# Altium PCB MD52-BC911MCU-影石电池版-261010.PcbDoc
Units mm, origin at the board's own origin, x right, y up, seen from the top; angles counter-clockwise.
Board outline 82 x 22 mm, 4 copper layers (Top Layer, Mid-Layer1, Mid-Layer2, Bottom Layer), stack 0.778 mm thick; 61 components, 61 nets, 197 pads, 154 vias.
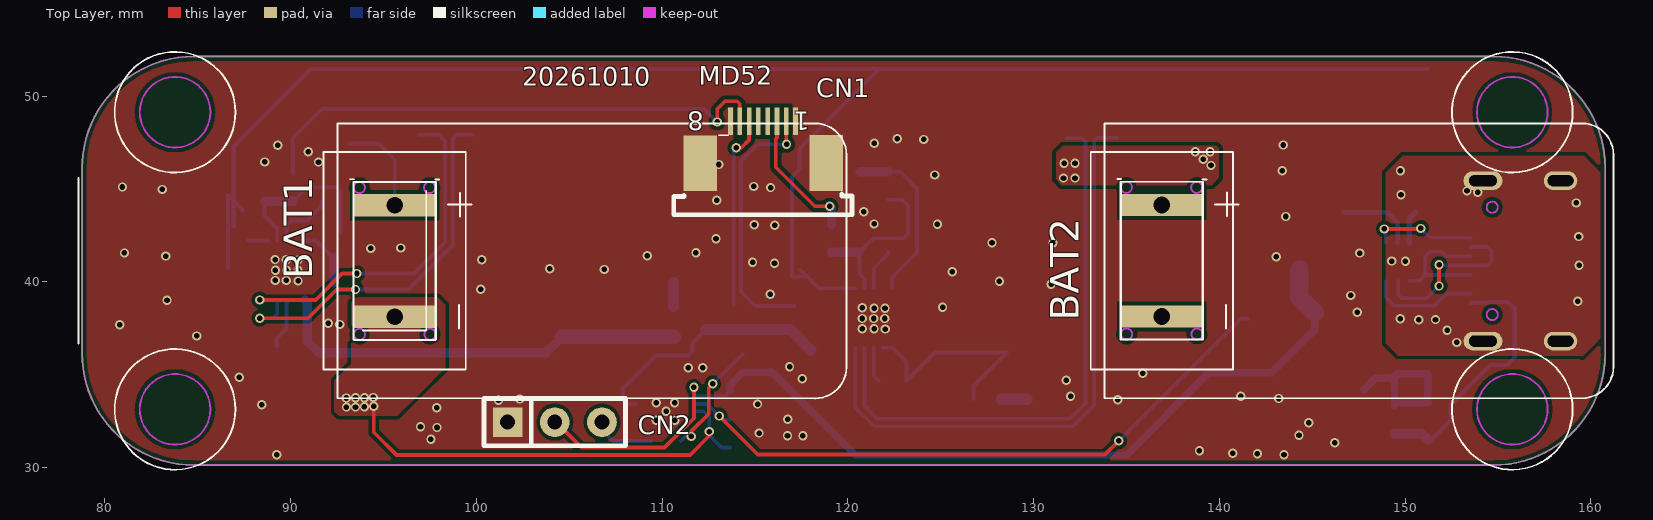
[diagram p0: Top Layer view]
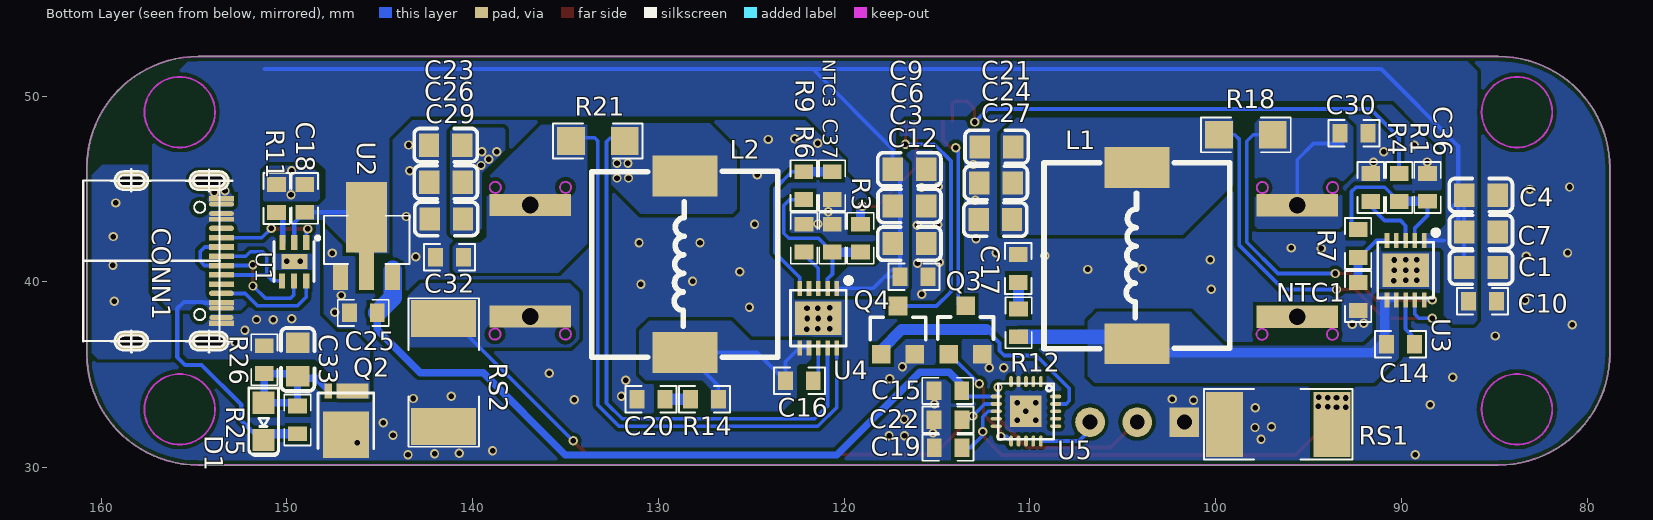
[diagram p1: Bottom Layer view, seen from below]

## Layer stack, top to bottom
Top Solder: solder mask 0.0102, Solder Resist, Dk 3.5
Top Layer: signal copper 0.0356
Dielectric 1: core 0.254, FR-4, Dk 4.2
Mid-Layer1: signal copper 0.036
Dielectric 3: prepreg 0.127, Dk 4.2
Mid-Layer2: signal copper 0.036
Dielectric 2: core 0.254, Dk 4.2
Bottom Layer: signal copper 0.0356
Bottom Solder: solder mask 0.0102, Solder Resist, Dk 3.5

## Board outline
78.774,36.137 ccw(c84.774,36.137) 84.774,30.137 154.774,30.137 ccw(c154.774,36.137) 160.774,36.137 160.774,46.137 ccw(c154.774,46.137) 154.774,52.137 84.774,52.137 ccw(c84.774,46.137) 78.774,46.137

## Design rules (kind name [scope] priority, off if disabled: settings)
Clearance [All] p1: gap=0.2 ignorepadtopadclearanceinfootprint=FALSE
ComponentClearance [All] p1: gap=0 collisioncheckmode=3 verticalgap=0 showdistances=FALSE
PlaneConnect [All] p1: planeconnectstyle=Direct reliefexpansion=0.508 reliefentries=4 reliefconductorwidth=0.254 reliefairgap=0.254
PolygonConnect [All] p1: connectstyle=Direct reliefconductorwidth=0.254 reliefentries=4 polygonreliefangle="90 Angle" airgapwidth=0.254
RoutingVias [All] p1: holewidth=0.711 width=1.27 viastyle="Through Hole" minholewidth=0.3 minwidth=0.5 maxholewidth=0.711 maxwidth=1.27
SilkToSolderMaskClearance [IsPad] p1: minsilkscreentomaskgap=0.1 clearancetoexposedcopper=TRUE
SolderMaskExpansion [All] p1: expansion=0.102 istentingtop=FALSE
Width [All] p1: maxlimit=10 minlimit=0.1 preferedwidth=0.15
27 further rules are at their usual default settings.

## Classes and differential pairs
component class HUSB337+SW6201+SW6201+SW6201+PY32F031(1)(3): C1 C3 C4 C6 C7 C9 C10 C12 C14 C16 C17 C18 C20 C21 C24 C26 C27 C29 C30 C32 CONN1 L1 L2 NTC1 NTC3 R1 R3 R4 R6 R7 R9 R11 R14 R18 R21 U3

## Components (designator, comment, footprint, x,y, rotation, side; value= is the part's Value field where it differs from the comment)
BAT1 "Comment" "电池座 -2-4PIN-2.0MM" 95.6,41.13 r90 top locked
BAT2 "Comment" "电池座 -2-4PIN-2.0MM" 136.9,41.14 r90 top locked
C1 "10uF/16V X7R 10%" "SMD-C0805 锡膏" 84.81,40.77 r0 bottom locked
C3 "10uF/16V X7R 10%" "SMD-C0805 锡膏" 115.59,42.06 r0 bottom locked (schematic designator C9)
C4 "NC" "SMD-C0805 锡膏" 84.82,44.67 r0 bottom locked
C6 "NC" "SMD-C0805 锡膏" 115.58,44.09 r0 bottom locked
C7 "NC" "SMD-C0805 锡膏" 84.81,42.69 r0 bottom locked
C9 "NC" "SMD-C0805 锡膏" 115.59,46.06 r0 bottom locked (schematic designator C3)
C10 "0.1uF" 0603 85.63,38.96 r0 bottom locked
C12 "0.1uF" 0603 116.24,40.28 r0 bottom locked
C14 "0.1uF" 0603 90.04,36.64 r180 bottom locked
C15 "2.2uf/50v" 0603 114.42,34.13 r0 bottom locked (schematic designator C3)
C16 "0.1uF" 0603 122.41,34.67 r180 bottom locked
C17 "1nF" 0603 110.62,40.72 r270 bottom locked
C18 "1uF/50V X7R 10%" 0603 149.04,44.5 r90 bottom locked
C19 "0.1uf/50v" 0603 114.4,31.08 r180 bottom locked (schematic designator C3)
C20 "1nF" 0603 130.4,33.68 r180 bottom locked
C21 "22uF/16V X7R 10%" "SMD-C0805 锡膏" 112.69,47.27 r180 bottom locked
C22 "0.1uf/50v" 0603 114.41,32.58 r180 bottom locked (schematic designator C3)
C23 "22uF/16V X7R 10%" "SMD-C0805 锡膏" 142.35,47.36 r180 bottom locked
C24 "22uF/16V X7R 10%" "SMD-C0805 锡膏" 112.73,45.33 r180 bottom locked (schematic designator C27)
C25 "0.1uf/50v" 0603 145.89,38.33 r180 bottom locked (schematic designator C3)
C26 "22uF/16V X7R 10%" "SMD-C0805 锡膏" 142.34,45.36 r180 bottom locked
C27 "NC" "SMD-C0805 锡膏" 112.76,43.36 r180 bottom locked (schematic designator C24)
C29 "NC" "SMD-C0805 锡膏" 142.32,43.39 r180 bottom locked
C30 "1uF" 0603 92.55,48.01 r0 bottom locked
C32 "1uF" 0603 141.25,41.32 r180 bottom locked
C33 "10uF/16V X7R 10%" "SMD-C0805 锡膏" 149.42,34.92 r90 bottom locked (schematic designator C21)
C36 "10nF/50V" 0603 88.59,45.09 r270 bottom locked (schematic designator C14)
C37 "10nF/50V" 0603 120.63,42.35 r270 bottom locked (schematic designator C14)
CN1 "" 连接器0.5*8 115.45,47.52 r180 top locked
CN2 "" SIP3 101.68,32.45 r0 top locked
CONN1 "输入" "SMD-TYPEC_16Pin 卧式" 152.94,36.81 r0 bottom locked
D1 "1N4148" SOD-323 151.26,32.49 r90 bottom locked
L1 "4.7uH" "SMD-L WHC1040 锡膏" 104.24,36.67 r90 bottom locked
L2 "4.7uH" "SMD-L WHC1040 锡膏" 128.58,36.2 r90 bottom locked (schematic designator L3)
NTC1 "NC" 0603 92.33,39.21 r270 bottom locked (schematic designator NTC)
NTC3 "NC" 0603 120.65,45.18 r270 bottom locked (schematic designator NTC2)
Q2 "SLN30N03T" DFN33-1 147.12,32.95 r0 bottom locked (schematic designator Q1)
Q3 "2N7002" SOT323 113.46,37.51 r90 bottom
Q4 "2N7002" SOT323 117.1,37.5 r90 bottom locked
R1 "10K" 0603 90.12,45.08 r90 bottom locked
R3 "10K" 0603 119.12,42.35 r90 bottom locked
R4 "910k" 0603 91.64,45.08 r90 bottom locked
R6 "910k" 0603 122.16,42.35 r90 bottom locked
R7 "NC" 0603 92.33,42.07 r90 bottom locked
R9 "NC" 0603 122.18,45.18 r270 bottom locked
R11 "NC" 0603 150.56,44.49 r90 bottom locked
R12 "4.7R" 0603 110.61,37.8 r90 bottom locked
R14 "4.7R" 0603 127.52,33.68 r0 bottom locked
R18 "22mR" 1206 98.37,47.92 r0 bottom locked
R21 "22mR" 1206 133.26,47.59 r180 bottom locked
R25 "20K" 0603 149.43,32.57 r90 bottom locked (schematic designator R4)
R26 "200K" 0603 151.21,35.81 r90 bottom locked (schematic designator R4)
RS1 "0.05R" 2512 96.63,32.33 r0 bottom locked (schematic designator R4)
RS2 "0.05R" 2512 141.56,35.12 r270 bottom locked (schematic designator R4)
U1 "HUSB237" HUSB237 149.27,41.3 r270 bottom locked
U2 "ME6203A33PG" SOT-89 145.71,42.26 r90 bottom locked
U3 "BC911 DNF" "DFN33 - 10PIN" 89.77,40.63 r0 bottom locked (schematic designator U1)
U4 "BC911 DNF" "DFN33 - 10PIN" 121.39,38.05 r0 bottom locked
U5 "WY8S8002A" QFN3*3-20 110.21,33.03 r270 bottom locked

## Footprints (in the part's own frame and the unit in brackets; to place one, negate y for a bottom-side part, rotate by r counter-clockwise, add the part's x,y. Pads: shape width x height; smd on the part's side, far side on the other; paste and mask are expansions set on the pad)
0603 [mm]
  rect 0.8x1 smd: 1(0.75,0) 2(-0.75,0)
  silkscreen extent -1.37,-0.71 1.37,0.71
1206 [mm]
  rect 1.5x1.5 smd: 1(1.448,0) 2(-1.448,0)
  silkscreen extent -2.41,-0.94 2.41,0.94
2512 [mm]
  rect 2x3.5 smd: 1(2.9,0) 2(-2.9,0)
  silkscreen extent -4,-1.9 4,1.9
"DFN33 - 10PIN" [mm]
  rect 0.25x0.8 smd: 1(-1,-1.6) 2(-0.5,-1.6) 3(0,-1.6) 4(0.5,-1.6) 5(1,-1.6) 6(1,1.6) 7(0.5,1.6) 8(0,1.6) 9(-0.5,1.6) 10(-1,1.6)
  rect 2.5x1.8 smd: 11(0,0)
  silkscreen extent -1.66,-2.06 1.5,1.5
DFN33-1 [mm]
  rect 0.4x0.8 smd: 1(0.65,-1.175)
  rect 2.5x2.5 smd: 2(-0.3,1.175)
  rect 1.7x0.8 smd: 3(-0.65,-1.175)
  silkscreen extent -1.8,-1.07 1.2,1.93
HUSB237 [mil]
  rect 31.5x13.23 smd: "1 CC1"(-32,12) "2 VBUS"(-32,-13) "3 VSET"(-32,-38) "4 D+"(49,-39) "5 D-"(49,-14) "6 "(49,12)
  rect 31.5x55.12 smd: EP(8,-13)
  silkscreen extent -45,-56 50,40
QFN3*3-20 [mm]
  oval 0.6x0.2 smd: 1(-1.6,0.8) 2(-1.6,0.4) 3(-1.6,0) 4(-1.6,-0.4) 5(-1.6,-0.8) 11(1.6,-0.8) 12(1.6,-0.4) 13(1.6,0) 14(1.6,0.4) 15(1.6,0.8)
  oval 0.2x0.6 smd: 6(-0.8,-1.6) 7(-0.4,-1.6) 8(0,-1.6) 9(0.4,-1.6) 10(0.8,-1.6) 16(0.8,1.6) 17(0.4,1.6) 18(0,1.6) 19(-0.4,1.6) 20(-0.8,1.6)
  rect 1.7x1.7 smd: 21(0,0)
  silkscreen extent -1.5,-1.5 1.5,1.5
SIP3 [mm]
  rect 1.6x1.6 hole 0.8: 1(0,0)
  round 1.6 hole 0.8: 2(2.54,0)
  round 1.6 hole 0.813: 3(5.08,0)
  silkscreen extent -1.27,-1.27 6.35,1.27
"SMD-C0805 锡膏" [mm]
  rect 1.1x1.25 smd: 1(0,0) 2(1.8,0)
  silkscreen extent -0.8,-0.9 2.6,0.9, body extent -0.1,-0.64 1.9,0.61, height 1.25
"SMD-L WHC1040 锡膏" [mm]
  rect 2.2x3.5 smd: 1(0,0) 2(9.492,0)
  silkscreen extent -0.26,-5 9.75,5, body extent -0.45,-5 9.95,5, height 3.9
"SMD-TYPEC_16Pin 卧式" [mm]
  oval 2.1x1 hole 0.6 slot 1.5 at 0 deg: 0(1.253,-8.64) 0(1.253,0)
  oval 1.8x1 hole 0.6 slot 1.4 at 0 deg: 0(5.433,-8.64) 0(5.433,0)
  round 0.3 on Bottom Overlay: 0(8.033,-4.32)
  rect 1.34x0.3 smd: A1(0.583,-7.67) A5(0.583,-5.57) A6(0.583,-4.57) A7(0.583,-4.07) A8(0.583,-3.07) A12(0.583,-0.97) B4(0.583,-2.07) B6(0.583,-3.57) B7(0.583,-5.07)
  oval 1.34x0.25 smd: A4(0.583,-6.87) A9(0.583,-1.77) B12(0.583,-7.37)
  oval 1.3x0.25 smd: B1(0.583,-1.27)
  oval 1.34x0.3 smd: B5(0.583,-2.57) B8(0.583,-6.07)
  rect 1.34x0.25 smd: B9(0.583,-6.57)
  Keep-Out Layer circle w0.1: c1.753,-1.43 r0.3
  Keep-Out Layer circle w0.1: c1.753,-7.21 r0.3
  silkscreen extent -0.03,-9.25 8.03,0.64
SOD-323 [mm]
  rect 1.2x1.2 smd: 1(1,0) 2(-1,0)
  silkscreen extent -1.85,-0.8 1.8,0.8
SOT323 [mm]
  rect 1x1 smd: 1(-1.4,0.9) 2(1.2,0) 3(-1.4,-0.9)
  silkscreen extent -0.6,-1.5 0.6,1.5
SOT-89 [mm]
  rect 1.4x0.8 smd: 1(-2,1.4) 3(-2,-1.4)
  rect 5x0.8 smd: 2(-0.2,0)
  rect 3.8x2.2 smd: 2(1.225,0)
  silkscreen extent -1.3,-2.3 1.3,2.3
"电池座 -2-4PIN-2.0MM" [mm]
  rect 1.2x4.4 hole 0.9: 1(-3,0) 4(3,0)
  Keep-Out Layer circle w0.1: c-3.95,-1.898 r0.3
  Keep-Out Layer circle w0.1: c3.95,1.902 r0.3
  Keep-Out Layer circle w0.1: c-3.951,1.892 r0.3
  Keep-Out Layer circle w0.1: c3.949,-1.883 r0.3
  silkscreen extent -4.25,-4.14 4.4,2.4
连接器0.5*8 [mm]
  rect 0.25x1.5 smd paste+0 mask+0.051: 1(-1.732,-1.132) 2(-1.232,-1.132) 3(-0.732,-1.132) 4(-0.232,-1.132) 5(0.268,-1.132) 6(0.768,-1.132) 7(1.268,-1.132) 8(1.768,-1.132)
  rect 1.8x3 smd paste+0 mask+0.051: 9(3.388,1.132) 10(-3.388,1.122)
  silkscreen extent -4.78,-0.38 4.83,3.9

## Part data
C1 C3 C4 C6 C7 C9 C10 C12 C14 C15 C16 C17 C19 C20 C21 C22 C23 C24 C25 C26 C27 C29 C30 C32 C33 C36 C37: library part CAP0603, "Capacitor"
C18: library part Cap, "Capacitor"
CONN1: library part "TYPC C"
L1 L2: library part INDUCTOR_SPM1010, "INDUCTOR"
NTC1 NTC3: library part "Res Varistor", "Varistor (Voltage-Sensitive Resistor)"
Q2: library part MOSFET-EH-P
R1 R3 R4 R6 R7 R9 R11 R12 R14 R18 R21 R25 R26 RS1 RS2: library part RES_0603, "Resistor"

## Via types
v1: diameter 0.5, hole 0.3, Top Layer to Bottom Layer, 154 vias

## Nets (pads, with @x,y where several pads share a name; then routed paths per layer and width w, separated by ;. In a path a pad name is that pad's centre, name@x,y a point inside that pad or via, vN(x,y) a via of type N, cw(c..) or ccw(c..) an arc to the next point about the centre after c; other vN are vias at no path point)
3.3V: C15.2 C25.1 CN2.2 U2.3 U5.6 | length 53.1
  Top Layer w0.2: CN2.2@104.23,32.27 104.47,32.27 105.66,31.08 110.134,31.08 111.71,32.656 v1(111.71,34.32)
  Bottom Layer w0.2: v1(111.71,34.32) 111.71,33.98 111.86,33.83 113.37,33.83 C15.2
  Bottom Layer w0.4: C15.2 113.67,34.46 114.35,35.14 115.93,35.14 120.39,30.68 135.02,30.68 139.44,35.1 142.82,35.1 145.14,37.42 C25.1
  Bottom Layer w1: U2.3@144.31,40.64 144.31,39.16 C25.1
12V: 
a1: "U1.3 VSET" R11.2 | length 1.8
  Bottom Layer w0.3: 150.235,42.113 150.235,43.415 R11.2
a2: C33.1 D1.1 Q2.1 R25.1 R26.2 | length 8.9
  Bottom Layer w0.4: Q2.1@147.77,34.185 148.39,34.805 149.305,34.805 C33.1 ; C33.1 149.56,35.06 R26.2 151.21,33.54 D1.1 149.6,33.49 R25.1 149.43,34.91 C33.1
a3: 
a4: 
a5: Q3.1 U5.11 | length 6.3
  Top Layer w0.2: v1(111.56,31.68) 111.56,31.94 112.51,32.89 112.51,34.294 v1(112.73,34.514)
  Bottom Layer w0.2: U5.11 111.26,31.68 v1(111.56,31.68) ; v1(112.73,34.514) 114.326,36.11 Q3.1
a6: Q4.1 U5.19 | length 13.8
  Bottom Layer w0.2: U5.19 108.04,33.43 107.875,33.595 107.875,34.255 109.66,36.04 111.38,36.04 111.63,36.29 111.63,36.717 112.343,37.43 ; Q4.1 Q4.1@118,36.33
  Bottom Layer w0.6: 112.343,37.43 116.9,37.43 Q4.1@118,36.33
a7: CN2.3 U5.15 | length 3.2
  Bottom Layer w0.2: CN2.3@106.545,32.235 107.35,31.43 U5.15
A8: CONN1.A8
a9: 
B8: CONN1.B8
CC1: "U1.6 " CONN1.B5 | length 5.9
  Bottom Layer w0.2: 148.965,40.055 148.965,39.185 149.43,38.72 151.58,38.72 152.24,39.38 CONN1.B5
CC2: "U1.1 CC1" CONN1.A5 | length 5.7
  Top Layer w0.2: v1(148.88,42.85) 150.82,42.85 v1(150.85,42.88)
  Bottom Layer w0.2: v1@148.85,42.88 v1(148.88,42.85) 148.965,42.765 148.965,42.113 ; v1(150.85,42.88) 151.35,42.38 CONN1.A5
DM: "U1.5 D-" CONN1.A7 CONN1.B7 | length 9.1
  Top Layer w0.2: v1(151.83,39.78) v1(151.83,40.92)
  Bottom Layer w0.2: 149.626,40.055 149.626,39.304 149.81,39.12 151.16,39.12 v1@151.81,39.77 ; v1(151.83,40.92) 151.87,40.88 CONN1.A7 154.44,40.88 154.67,41.11 154.67,41.64 154.43,41.88 CONN1.B7
DP: "U1.4 D+" CONN1.A6 CONN1.B6 | length 7.1
  Bottom Layer w0.2: 150.261,40.055 150.77,40.055 151.08,40.365 ; CONN1.B6 153.523,40.37 151.085,40.37 151.08,40.365 ; CONN1.A6 152.22,41.38 151.98,41.62 151.32,41.62 151.08,41.38 151.08,40.365
GND: C1.1 C3.1 C4.1 C6.1 C7.1 C9.1 C10.2 C12.2 C15.1 C17.2 C19.2 C20.2 C21.1 C22.2 C23.1 C24.1 C25.2 C26.1 C27.1 C29.1 C30.2 C32.2 C36.2 C37.2 CN1.1 CN1.8 CN1.9 CN1.10 CN2.1 NTC1.1 NTC3.1 Q2.2 Q3.3 Q4.3 R4.1 R6.1 RS1.1 RS2.1 U2.1 U3.11 U4.11 U5.4 U5.21
  other v1: 89.25,30.69 143.48,30.7 142.05,30.74 140.72,30.78 138.93,30.91 146.21,31.34 97.55,31.52 116.75,31.72 117.58,31.72 144.29,31.74 115.22,31.86 97.88,32.16 96.99,32.2 144.81,32.41 109.69,32.55 110.68,32.54 116.76,32.6 110.21,33.03 97.87,33.22 88.44,33.39 115.14,33.42 109.69,33.49 110.67,33.5 101.19,33.62 134.53,33.65 102.34,33.69 143.2,33.72 131.99,33.85 141.16,33.84 131.76,34.7 117.55,34.79 87.23,34.87 135.88,35.08 111.41,35.38 112.19,35.38 116.86,35.43 84.95,37.09 120.78,37.48 121.41,37.47 122.01,37.46 80.8,37.7 92.65,37.71 92.02,37.78 120.78,38.03 121.4,38.03 121.99,38.03 147.42,38.37 121.41,38.58 122,38.58 120.77,38.61 125.1,38.63 83.34,39.01 147.07,39.27 115.82,39.33 100.23,39.6 130.94,39.87 128.16,40.04 90.4,40.05 89.17,40.08 89.76,40.08 125.62,40.54 89.18,40.63 89.77,40.63 90.39,40.63 106.88,40.67 103.95,40.7 116.05,41.01 114.87,41.05 89.76,41.19 90.39,41.18 100.29,41.19 89.16,41.2 143.06,41.36 83.28,41.39 109.2,41.4 81.05,41.56 111.82,41.57 147.56,41.55 94.31,41.8 95.93,41.83 127.76,42.11 131.04,42.11 112.9,42.32 116.07,43.05 114.96,43.08 121.41,43.12 124.82,43.1 143.57,43.52 120.86,43.77 112.94,44.39 83.09,44.98 115.84,45.08 80.94,45.11 114.93,45.14 124.67,45.76 143.39,45.99 113.05,46.32 88.6,46.46 91.5,46.45 90.94,47.01 89.31,47.36 143.44,47.37 121.42,47.47 124.08,47.67 122.66,47.7
GND1: C18.1 C33.2 CONN1.0@154.193,36.81 CONN1.0@154.193,45.45 CONN1.0@158.373,36.81 CONN1.0@158.373,45.45 CONN1.A1 CONN1.A12 CONN1.B1 CONN1.B12 Q2.3 R11.1 R26.1 U1.EP
  other v1: 152.78,36.74 152.26,37.4 150.74,37.96 151.64,37.97 149.74,38.02 159.29,38.96 159.37,40.89 150.02,41.11 149.29,41.12 159.35,42.44 159.21,44.25 149.78,44.69 153.91,44.82 153.335,44.896 149.75,45.99
LEDG_1: CN1.7 R1.1 | length 28.8
  Top Layer w0.2: v1(112.96,48.61) 112.96,49.3 113.38,49.72 114.05,49.72 114.182,49.588 CN1.7
  Bottom Layer w0.2: R1.1 90.12,47.77 91.66,49.31 112.26,49.31 v1(112.96,48.61)
LEDG_2: CN1.3 R3.1 | length 7.3
  Top Layer w0.2: CN1.3 116.182,47.762 116.12,47.7 116.12,46.17 118.22,44.07 v1(119.02,44.07)
  Bottom Layer w0.5: v1(119.02,44.07) 119.12,43.97 R3.1
LEDG_3: 
LEDR_1: CN1.6 Q3.2 | length 10.4
  Top Layer w0.2: v1(113.99,47.22) 114.26,47.22 114.682,47.642 CN1.6
  Bottom Layer w0.2: Q3.2@113.85,38.73 113.85,47.08 v1(113.99,47.22) v1@114,47.23
LEDR_2: CN1.2 Q4.2 | length 14.3
  Top Layer w0.2: CN1.2 116.682,47.392 v1(116.7,47.41)
  Bottom Layer w0.2: v1(116.7,47.41) 115.15,47.41 114.25,46.51 114.25,39.47 115.02,38.7 Q4.2
LEDR_3: 
NetC14_1: C14.1 U3.8 | length 2.7
  Bottom Layer w0.2: C14.1@89.24,36.54 89.24,36.94 89.77,37.47 U3.8
NetC14_2: C14.2 L1.1 R12.2 U3.6 U3.7 | length 22.6
  Bottom Layer w0.2: U3.7 U3.6
  Bottom Layer w0.5: U3.6 90.89,38.91 90.89,36.8 91.51,36.18 103.75,36.18 L1.1
  Bottom Layer w0.8: L1.1@104.62,37.05 R12.2
NetC15_1: 
NetC15_2: 
NetC16_1: C16.1 U4.8 | length 1.9
  Bottom Layer w0.2: U4.8 121.39,34.94 C16.1
NetC16_2: C16.2 L2.1 R14.2 U4.6 U4.7 | length 11.9
  Bottom Layer w0.2: U4.7 U4.6 122.41,36.45 123.16,35.7 C16.2 124.69,36.2 L2.1 126.77,34.39 R14.2
NetC17_1: C17.1 R12.1 | length 1.3
  Bottom Layer w0.6: R12.1@110.62,38.68 C17.1
NetC18_2: 
NetC19_1: 
NetC20_1: C20.1 R14.1 | length 1.4
  Bottom Layer w0.6: R14.1 C20.1
NetC21_2: C21.2 C24.2 C27.2 L1.2 R18.1 U3.9 | length 20.7
  Top Layer w0.2: v1(88.33,38.04) 90.926,38.04 92.476,39.59 v1(93.49,39.59)
  Bottom Layer w0.2: v1(88.33,38.04) 89.05,38.04 89.27,38.26 U3.9 ; v1(93.49,39.59) 96.346,39.59 98.72,41.964 98.72,47.67 98.97,47.92 R18.1
NetC22_2: 
NetC23_2: C23.2 C26.2 C29.2 L2.2 R21.1 U4.9 | length 30.8
  Bottom Layer w0.2: U4.9 120.89,33.32 121.58,32.63 131.95,32.63 132.79,33.47 132.79,47.54 132.59,47.74 R21.1@131.762,47.74
  other v1: 131.61,45.59 132.23,45.59 139.55,46.27 131.64,46.38 132.23,46.38 139.13,46.61 138.71,47.01 139.5,47.01
NetNTC1_2: NTC1.2 R7.2 U3.5 | length 3.8
  Bottom Layer w0.2: U3.5 91.34,42.23 92.33,41.24 92.33,40.8
  Bottom Layer w0.5: NTC1.2 R7.2@92.33,41.34
NetNTC2_2: 
NetNTC3_2: NTC3.2 R9.2 U4.5 | length 9.4
  Bottom Layer w0.2: R9.2 122.82,45.93 123.72,45.03 123.72,41.57 122.39,40.24 U4.5
  Bottom Layer w0.5: NTC3.2 R9.2
NetQ1_1: 
NetR1_2: C36.1 R1.2 R7.1 U3.2 | length 9.1
  Bottom Layer w0.2: C36.1 88.59,43.58 89.27,42.9 U3.2 ; R1.2@90.11,44.34 R1.2 90.89,45.1 92.44,45.1 92.68,44.86 R7.1@92.68,42.65
  Bottom Layer w0.5: C36.1 R1.2@90.11,44.34
NetR2_2: 
NetR3_2: C37.1 R3.2 R9.1 U4.2 | length 9.3
  Bottom Layer w0.2: U4.2 120.89,40.17 120.63,40.43 C37.1 121.38,42.35 122.98,42.35 123.25,42.62 123.25,44.11 122.93,44.43 R9.1
  Bottom Layer w0.5: R3.2 C37.1
NetR4_2: R4.2 U3.3 | length 3.4
  Bottom Layer w0.2: U3.3 89.77,43.02 90.05,43.3 90.9,43.3 91.64,44.04 R4.2
NetR5_2: 
NetR6_2: R6.2 U4.3 | length 2.3
  Bottom Layer w0.2: U4.3 121.39,40.73 122.16,41.5 R6.2
NetR15_2: 
NetR16_2: 
NetR17_2: 
NetR19_1: 
NetR22_1: 
NetR23_1: 
NewNet: 
RS1: BAT1.1 C19.1 RS1.2 U5.8 | length 23.9
  Top Layer w0.2: v1(94.47,33.3) 94.47,31.91 95.7,30.68 111.51,30.68 112.54,31.71 v1(112.54,31.94)
  Bottom Layer w0.2: U5.8 112.24,33.03 112.53,32.74 112.53,31.74 113.19,31.08 C19.1
  other v1: 93,33.26 93.49,33.26 93.97,33.27 92.99,33.75 93.49,33.76 93.97,33.76 94.45,33.78
RS2: BAT2.1 C22.1 RS2.2 U5.7 | length 34.6
  Top Layer w0.2: v1(113.08,32.78) 115.15,30.71 133.85,30.71 v1(134.58,31.44)
  Bottom Layer w0.2: U5.7 112.43,33.43 v1(113.08,32.78) 113.28,32.58 C22.1 ; v1(134.58,31.44) 141.16,38.02 RS2.2
RS3: 
VBAT1: BAT1.4 C30.1 R18.2 U3.10 | length 23.9
  Top Layer w0.2: v1(88.34,39.03) 91.35,39.03 92.77,40.45 v1(93.56,40.45)
  Bottom Layer w0.2: v1(88.34,39.03) U3.10 ; 93.17,47.45 94.722,47.45 95.6,46.572 BAT1.4 ; v1(93.56,40.45) 96.64,40.45 98.32,42.13 98.32,47.57 97.97,47.92 R18.2
VBAT2: BAT2.4 C32.1 R21.2 U4.10 | length 32.5
  Bottom Layer w0.2: U4.10 120.39,33.254 121.414,32.23 132.116,32.23 133.26,33.374 133.26,47.59 133.43,47.76 R21.2@134.518,47.76
VBAT3: 
VIN: "U1.2 VBUS" C1.2 C3.2 C4.2 C6.2 C7.2 C9.2 C10.1 C12.1 C18.2 CONN1.A4 CONN1.A9 CONN1.B4 CONN1.B9 D1.2 R25.2 U2.2 U3.1 U4.1 | length 112
  Bottom Layer w0.2: 117.435,40.655 118.44,39.65 U4.1 ; 117.83,40.28 C12.1 116.99,45.66 C9.2 117.39,47.16 121.69,51.46 123.81,51.46
  Bottom Layer w0.23: C1.2 86.62,40.78 C4.2 87.4,43.89 ; C7.2@86.94,43.01 86.94,47.32 91.08,51.46 121.69,51.46 ; 87.72,42.23 U3.1 ; 123.81,51.46 151.2,51.46 ; U2.2@146.675,43.75 C18.2 149.6,43.19 149.6,42.113 ; D1.2@151.3,31.38 152.46,32.54 152.46,33.39 154.6,35.53 155.48,35.53 155.91,35.96 155.91,38.55 155.542,38.918 154.485,38.918 154.447,38.88 CONN1.B4
  Bottom Layer w0.5: R25.2 150.93,31.82 D1.2
pads on no net: CN1.4 CN1.5 CONN1.0@160.973,41.13 U3.4 U4.4 U5.1 U5.2 U5.3 U5.5 U5.9 U5.10 U5.12 U5.13 U5.14 U5.16 U5.17 U5.18 U5.20

## Polygon pours and split planes (outlines as drawn)
GND on Bottom Layer "Bottom Layer-No Net" (solid, remove dead copper, pour order 32): 82.85,30.1 79.07,33.88 78.76,33.88 78.76,48.68 82.37,52.29 157.26,52.29 160.8,48.75 160.8,33.36 157.54,30.1
VIN on Bottom Layer "Bottom Layer-No Net" (solid, remove dead copper, pour order 28): 120.51,39.25 118.09,39.25 117.79,39.55 117.78,39.56 116.87,39.56 116.7,39.56 116.53,39.73 116.53,46.37 117.21,47.05 117.21,48.45 115.97,49.69 122.8,49.69 119.77,46.66 119.77,45.93 118.43,44.59 118.11,44.27 118.11,43.28 118.11,41.02 118.32,40.81 119.77,40.81 120.52,40.06
GND1 on Bottom Layer "Bottom Layer-No Net" (solid, remove dead copper, pour order 24): 147.32,33.698 147.32,34.67 147.91,35.26 148.49,35.84 149.55,35.84 160.184,35.84 160.774,36.43 160.774,45.476 160.06,46.19 159.94,46.31 153.63,46.31 148.75,46.31 148.21,45.77 148.23,45.75 148.23,40.93 148.23,38.2 147.32,37.29 146.42,37.29 145.54,36.41 145.54,33.718
VIN on Bottom Layer "Bottom Layer-No Net" (solid, remove dead copper, pour order 22): 85.9,37.96 85.9,51.34 86.72,52.16 155.03,52.16 156.92,50.27 157.25,49.94 157.25,45.51 157.25,39.42 156.3,38.47 152.51,38.47 151.47,39.51 151.47,42.85 151.47,46.03 151.14,46.36 151.03,46.47 149.96,46.47 148.36,46.47 148.15,46.26 147.92,46.03 147.92,44.91 147.92,44.5 148.06,44.36 148.29,44.13 149.51,44.13 149.51,43.4 149.45,43.34 148.09,43.34 147.51,42.76 146.3,41.55 144.5,41.55 144.5,47.74 143.82,48.42 143.33,48.91 131.57,48.91 113.39,48.91 112.67,49.63 112.56,49.74 110.73,49.74 90.43,49.74 88.06,47.37 87.62,46.93 87.62,45.58 87.62,43.09 87.78,42.93 88.08,42.63 88.89,42.63 88.89,41.84 88.9,41.83 87.9,41.83 87.87,41.8 87.72,41.65 87.72,40.62 87.72,38.21 87.42,37.91 87.23,37.72 86.12,37.72
RS2 on Bottom Layer "Bottom Layer-No Net" (solid, remove dead copper, pour order 20): 143.33,36.47 134.72,36.47 134.43,36.76 134.25,36.94 134.25,37.52 134.25,39.4 134.35,39.5 134.78,39.93 135.43,39.93 142.8,39.93 143.23,39.5 143.5,39.23 143.5,36.72
NetC23_2 on Bottom Layer "Bottom Layer-No Net" (solid, remove dead copper, pour order 16): 141.21,42.51 141.21,48.12 141.12,48.21 141.03,48.3 140.64,48.3 138.34,48.3 138.31,48.27 138.24,48.2 138.24,47.66 138.24,47.11 138.74,46.61 139.5,45.85 139.5,45.15 139.5,42.88 139.84,42.54
VBAT2 on Bottom Layer "Bottom Layer-No Net" (solid, remove dead copper, pour order 14): 133.82,48.46 133.82,42.06 134.63,41.25 135.38,40.5 140.72,40.5 140.91,40.5 141.01,40.6 141.07,40.66 141.07,41.67 141.07,41.9 140.87,42.1 140.18,42.1 139.59,42.1 139.45,42.24 139.25,42.44 139.25,42.94 139.25,45.53 139.22,45.56 136.31,48.47 135.29,48.47
NetC23_2 on Bottom Layer "Bottom Layer-No Net" (solid, remove dead copper, pour order 12): 132.54,48.37 132.54,45.26 131.48,44.2 130.94,43.66 127.05,43.66 126.03,43.66 125.83,43.86 125.79,43.9 125.79,46.16 125.79,47.09 126.97,48.27 127.23,48.53 132.42,48.53
NetC16_2 on Bottom Layer "Bottom Layer-No Net" (solid, remove dead copper, pour order 10): 121.76,36.87 121.76,35.87 121.96,35.67 122.03,35.6 122.21,35.6 122.38,35.6 122.55,35.43 122.55,33.8 122.6,33.75 123.31,33.04 127.18,33.04 127.18,34.23 127.48,34.53 127.65,34.7 128.18,34.7 130.67,34.7 130.71,34.74 131.02,35.05 131.02,35.35 131.02,37.38 130.74,37.66 130.49,37.91 128.77,37.91 126.07,37.91 125.38,37.22 125.02,36.86 121.75,36.86
VBAT1 on Bottom Layer "Bottom Layer-No Net" (solid, remove dead copper, pour order 8): 97.9,48.54 97.9,43.03 97.84,42.97 97.74,42.87 96.59,42.87 93.81,42.87 93.33,42.87 93.17,43.03 93.17,43.1 93.17,45.38 92.72,45.83 92.6,45.95 92.6,46.65 92.6,48.33 92.88,48.61 93.08,48.81 97.63,48.81
NetC21_2 on Bottom Layer "Bottom Layer-No Net" (solid, remove dead copper, pour order 6): 99.05,48.69 99.05,45.25 100.13,44.17 101.76,42.54 111.58,42.54 111.58,47.95 111.47,48.06 110.7,48.83 99.25,48.83
NetC14_2 on Bottom Layer "Bottom Layer-No Net" (solid, remove dead copper, pour order 2): 90.15,39.422 90.15,35.89 90.56,35.48 91.48,34.56 94.58,34.56 106.5,34.56 106.75,34.81 106.87,34.93 106.87,35.33 106.87,37.89 106.48,38.28 106.38,38.38 104.06,38.38 101.35,38.38 101.19,38.22 99.53,36.56 97.16,36.56 91.99,36.56 91.68,36.87 91.35,37.2 91.35,38.48 91.35,39.19 91.108,39.432
GND on Top Layer "Bottom Layer-No Net" (solid, remove dead copper, pour order 34): 78.88,49.38 81.62,52.12 86.57,52.12 157.26,52.12 160.806,48.574 160.806,33.724 157.152,30.07 147.18,30.07 82.14,30.07 78.77,33.44
GND1 on Top Layer "Bottom Layer-No Net" (solid, remove dead copper, pour order 26): 148.96,45.83 148.96,36.68 149.61,36.03 153.54,36.03 159.49,36.03 159.54,35.98 160.82,37.26 160.82,37.33 160.82,45.604 160.774,45.65 159.634,46.79 159.22,46.79 149.85,46.79 148.96,45.9
NetC23_2 on Top Layer "Bottom Layer-No Net" (solid, remove dead copper, pour order 18): 131.51,45.21 139.59,45.21 139.79,45.41 139.98,45.6 139.98,46.03 139.98,47.19 139.84,47.33 139.83,47.32 138.68,47.32 131.57,47.32 131.23,46.98 131.21,46.96 131.21,45.52
RS1 on Top Layer "Bottom Layer-No Net" (solid, remove dead copper, pour order 4): 93.25,38.88 93.25,35.59 92.82,35.16 92.35,34.69 92.35,33.67 92.35,33.03 92.53,32.85 92.6,32.78 94.71,32.78 95.74,32.78 96.94,33.98 98.33,35.37 98.33,38.31 98.33,38.76 98.13,38.96 97.91,39.18 93.56,39.18

## Keep-outs
Keep-Out Layer:
  circle w0.1: c83.774,49.137 r1.9
  circle w0.1: c83.774,33.137 r1.9
  circle w0.1: c155.774,49.137 r1.9
  circle w0.1: c155.774,33.137 r1.9
  lines w0.1: 78.774,36.137 ccw(c84.774,36.137) 84.774,30.137 154.774,30.137 ccw(c154.774,36.137) 160.774,36.137 160.774,46.137 ccw(c154.774,46.137) 154.774,52.137 84.774,52.137 ccw(c84.774,46.137) 78.774,46.137 78.774,36.137

## Silkscreen, mask and mechanical layers (free items; w line width, h text height)
Top Overlay:
  circle w0.1: c155.774,33.137 r3.25
  circle w0.1: c155.774,49.137 r3.25
  circle w0.1: c83.774,33.137 r3.25
  circle w0.1: c83.774,49.137 r3.25
  lines w0.1: 93.374,45.387 93.374,36.887 97.827,36.887 97.827,45.387 ; 93.901,37.387 97.301,37.387 97.301,44.887 ; 103.6,48.537 118.227,48.537 ; 103.774,48.537 92.524,48.537 92.524,33.737 118.224,33.737 ; 118.224,48.537 cw(c118.224,46.837) 119.924,46.837 ; 118.227,33.726 ccw(c118.227,35.426) 119.927,35.426 ; 119.924,35.407 119.924,46.84 ; 134.674,45.387 134.674,36.887 139.127,36.887 139.127,45.387 ; 78.574,36.667 78.574,45.607 78.574,36.667 ; 91.774,35.287 91.774,46.987 99.427,46.987 99.427,35.287 91.774,35.287 ; 133.074,35.287 140.727,35.287 140.727,46.987 133.074,46.987 133.074,35.287 ; 133.824,33.737 159.524,33.737 ccw(c159.524,35.437) 161.224,35.437 161.224,46.837 ccw(c159.524,46.837) 159.524,48.537 133.824,48.537 133.824,33.737
  text "MD52" at 111.98,50.61 h1
  text "20261010" at 102.46,50.55 h1

## Text inside footprints (layer, text, board x,y; h text height)
CN1: Top Overlay "8" at 112.229,49.16 h1 r180; Top Overlay "1" at 117.944,49.16 h1 r180